# Altium PCB PCI Express Mini L1_V1.PCBDOC (part 9 of 9)
Units mm, origin at the board's own origin, x right, y up, seen from the top; angles counter-clockwise.
Board outline 70 x 83.2 mm, 6 copper layers (TopLayer, Layer 1, Layer 2, Layer 3, Layer 4, Bottom Layer), stack 0.914 mm thick; 442 components, 259 nets, 1412 pads, 857 vias.
Unrouted connection lines stored in the file: 2.
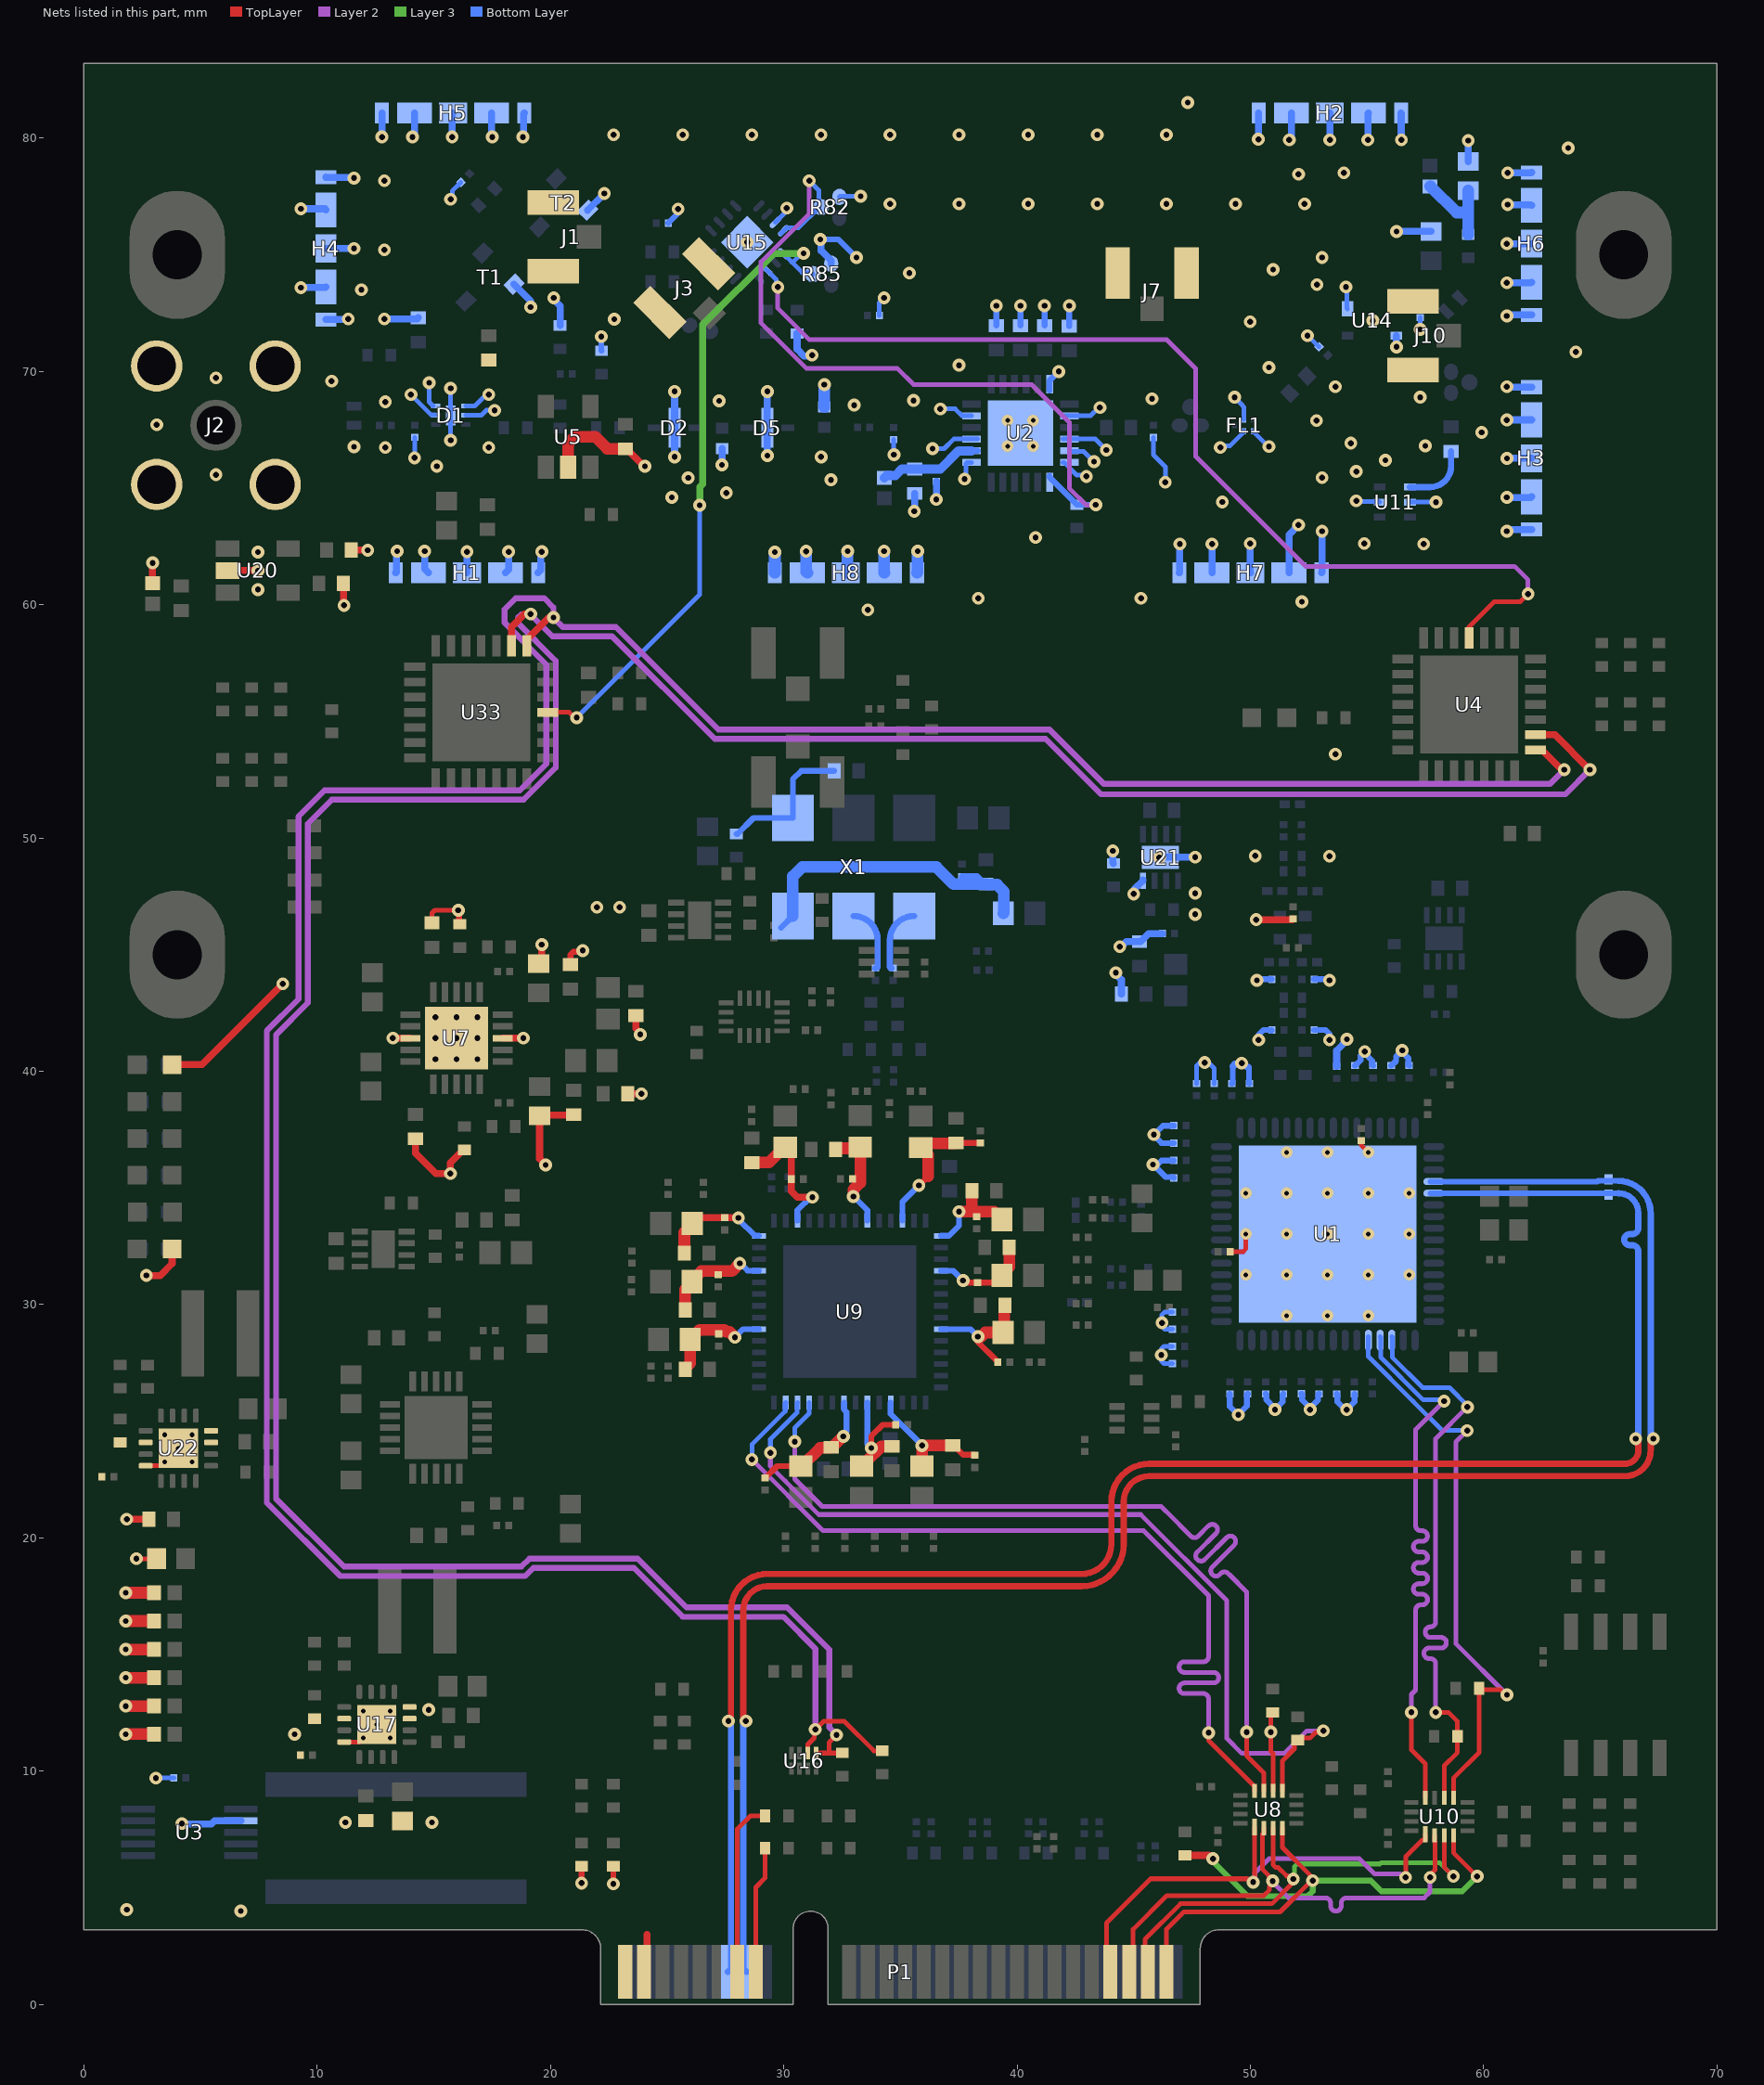
[diagram p9: the nets of this part, all layers, seen from the top]

## Via types
v1: diameter 0.55, hole 0.25, TopLayer to Bottom Layer, tented both sides, 782 vias
v2: diameter 0.55, hole 0.25, TopLayer to Bottom Layer, 40 vias
v3: diameter 0.5, hole 0.2, TopLayer to Bottom Layer, 25 vias
v4: diameter 0.35, hole 0.2, TopLayer to Bottom Layer, 10 vias

## Nets (pads, with @x,y where several pads share a name; then routed paths per layer and width w, separated by ;. In a path a pad name is that pad's centre, name@x,y a point inside that pad or via, vN(x,y) a via of type N, cw(c..) or ccw(c..) an arc to the next point about the centre after c; other vN are vias at no path point) (continued)
PGND: C27.1 C29.1 C44.1 C86.1 C87.1 C90.1 C93.1 D7.2 FB1.1 FB5.1 FB6.1 FB13.1 FB14.1 FB30.1 P1.1 P1.3 R121.1 R125.1 R129.2 R130.2 U3.7 U17.6 U17.8 U17.15 U17.16 U17.17 U22.6 U22.8 U22.15 U22.16 U22.17 | length 21.2
  TopLayer w0.2: v1(2.254,19.109) C87.1@3.115,19.109 ; U22.8@2.47,23.092 U22.8@2.65,23.092 2.66,23.102 3.31,23.102 v4(3.47,23.262) v4(4.05,23.842) ; U17.8@11.156,11.253 11.806,11.253 v4(11.976,11.423) v4(12.556,12.003)
  TopLayer w0.25: v1(21.333,5.206) R129.2@21.333,5.925 ; v2(22.691,5.168) R130.2@22.691,5.925
  TopLayer w0.3: v1(1.837,20.801) C90.1@2.79,20.8 ; v1(2.675,31.25) 3.274,31.25 3.781,31.756 D7.2@3.781,32.38 ; P1.3@24,1.4 24.142,1.542 24.142,2.999
  TopLayer w0.5: v1(1.79,11.589) FB1.1@3.009,11.588 ; v1(1.79,12.792) FB30.1@3.009,12.792 ; v1(1.79,14.006) FB13.1@3.009,14.006 ; v1(1.79,15.221) FB6.1@3.009,15.221 ; v1(1.79,16.436) FB14.1@3.009,16.435 ; v1(1.79,17.65) FB5.1@3.009,17.65
  Bottom Layer w0.2: v1(3.083,9.703) 3.085,9.706 3.85,9.706 C44.1@3.852,9.708
  Bottom Layer w0.3: v1(4.197,7.756) 4.213,7.739 5.466,7.739 5.602,7.875 U3.7@6.724,7.875
  other v1: 6.724,4.006 1.837,4.067 11.206,7.806 14.913,7.806 14.781,12.633
  other v2: 9.031,11.588
  other v4: 13.136,11.423 11.976,12.583 13.136,12.583 4.63,23.262 3.47,24.422 4.63,24.422
Q: R85.3 U15.13 U33.4 | length 28.3
  TopLayer w0.2: U33.4@19.88,55.391 20.797,55.391 21.026,55.162 v1(21.121,55.162)
  Layer 3 w0.3: v1(26.396,64.264) 26.396,65.049 26.526,65.179 26.526,72.006 29.58,75.06 v1(30.844,75.06)
  Bottom Layer w0.2: v1(21.121,55.162) 26.396,60.437 v1(26.396,64.264) ; U15.13@29.989,75.044 30.339,74.693 ; v1(30.844,75.06) 30.764,75.06 30.398,74.693 30.339,74.693 ; R85.3@31.243,74.171 31.177,74.237 30.796,74.237 30.339,74.693
Q\: R39.1 R82.3 U2.19 U15.12 | length 32
  Layer 2 w0.2: v1(31.091,78.175) 31.091,76.767 29.025,74.701 29.025,72.074 30.972,70.127 34.873,70.127 35.567,69.433 40.625,69.433 42.235,67.823 42.235,64.996 42.967,64.264 43.347,64.264 v1(43.37,64.287)
  Bottom Layer w0.2: U15.12@29.883,75.928 U15.12@29.943,75.988 ; U15.12@29.989,76.034 30.12,76.165 30.634,76.165 31.505,77.036 31.503,77.038 31.503,77.764 v1(31.091,78.175)
  Bottom Layer w0.25: U2.19@41.389,65.525 41.389,65.475 R39.1@42.541,64.323 ; R39.1@42.562,64.287 v1(43.37,64.287)
RFGND: C1.2 C2.2 C4.1 C7.1 C8.1 C9.1 C10.2 C11.2 C12.2 C13.2 C14.2 C24.1 C30.1 C31.1 C33.1 C34.1 C42.1 C46.1 C47.2 C51.2 C61.1 C63.1 C66.1 C67.1 C68.1 C69.1 C71.1 C72.1 C77.1 C78.1 C83.2 C84.1 C85.1 C99.1 C100.1 C101.1 C102.1 C103.1 C104.1 C105.1 C106.1 C107.1 C108.1 C109.1 C110.1 C111.1 C113.1 C114.1 C115.1 C116.1 C117.1 C118.1 C119.1 C120.1 C121.1 C122.1 C123.1 C124.1 C125.1 C252.1 C253.1 C256.1 C257.1 C259.1 D1.2 D1.3 D1.4 D1.5 D1.7 D2.2 D3.2 D5.2 FB11.2 FL1.B FL1.C FL1.E H1.1 H2.1 H3.1 H4.1 H5.1 H6.1 H7.1 H8.1 J1.1 J1.3 J2.MH J3.1 J3.3 J7.1 J7.3 J10.1 J10.3 L1.1 L4.1 R58.1 R60.1 R68.1 R82.1 R85.1 R87.1 R88.2 R103.2 T1.2 T2.2 U1.65 U2.1 U2.3 U2.5 U2.12 U2.14 U2.16 U2.17 U2.18 U2.25 U5.2 U7.3 U7.13 U7.21 U11.2 U11.5 U14.2 U14.4 U15.11 U15.17 U20.2 U21.4 U21.9 | length 170
  TopLayer w0.2: C47.2@14.916,46.368 14.916,46.788 15.034,46.905 v1(16.045,46.905) ; C121.1@49.128,32.275 49.691,32.275 49.808,32.392 v3(49.808,33.025) ; C69.1@54.753,37.027 54.753,36.83 v3(55.058,36.525)
  TopLayer w0.25: v1(16.045,46.905) 16.081,46.869 16.081,46.343 R58.1@16.116,46.307 ; C71.1@20.848,44.572 20.848,44.995 20.976,45.123 21.326,45.123 v1(21.383,45.18)
  TopLayer w0.3: FB11.2@2.944,60.919 v1(2.944,61.795) ; D3.2@3.781,40.283 5.058,40.283 v1(8.525,43.75) ; U20.2@6.158,61.462 v1(7.458,61.462) ; C63.1@11.122,60.919 11.136,60.905 11.136,59.989 v1(11.15,59.975) ; C61.1@11.459,62.346 11.463,62.343 12.158,62.343 v1(12.162,62.34) ; v1(13.242,41.423) U7.3@13.995,41.423 ; C51.2@14.205,37.107 14.205,36.494 15.083,35.617 v1(15.708,35.617) 15.708,36.082 16.264,36.637 R60.1@16.314,36.637 ; U7.13@17.945,41.423 v1(18.832,41.423) ; C42.1@19.49,44.614 19.627,44.75 v1(19.627,45.436) ; v1(19.791,35.989) 19.532,36.247 C46.1@19.532,38.093 19.557,38.117 20.974,38.117 C67.1@20.998,38.142 ; C34.1@23.212,66.683 23.262,66.683 24.013,65.932 v1(24.048,65.932) ; C68.1@23.304,39.041 v1(23.896,39.041) ; C72.1@23.659,42.386 23.659,41.836 23.846,41.648 v1(23.846,41.58) ; v1(50.25,46.5) 51.785,46.5 ccw(c51.785,46.54) C4.1@51.822,46.526
  TopLayer w0.5: U5.2@20.755,65.901 20.755,66.908 21.048,67.201 21.918,67.201 22.436,66.683 C34.1@23.212,66.683
  Bottom Layer w0.2: v1(14.016,69.006) 14.872,68.15 D1.2@15.039,68.15 ; v1(14.175,66.298) C252.1@14.175,67.175 ; v1(14.795,69.519) 14.795,68.695 D1.3@14.97,68.52 ; v1(15.72,67.05) D1.7@15.72,68.12 v1(15.72,69.273) ; v1(15.72,77.382) 15.787,77.448 15.787,77.733 C84.1@16.16,78.107 ; D1.5@16.37,68.12 17.033,68.12 17.247,68.334 v1(17.604,68.334) ; D1.4@16.37,68.52 16.756,68.52 17.242,69.006 v1(17.355,69.006) ; U15.11@29.635,76.387 30.125,76.877 v1(30.125,77) ; R82.1@32.386,77.486 32.408,77.508 v1(33.295,77.508) ; C83.2@34.098,72.402 34.098,72.955 v1(34.294,73.152) ; C253.1@34.699,67.08 34.699,66.453 v1(34.72,66.433) ; v1(36.378,66.691) 36.875,66.691 37.284,67.1 U2.3@38.039,67.1 U2.3@38.314,67.1 ; v1(36.708,68.395) 37.34,68.395 37.635,68.1 U2.5@38.039,68.1 ; v1(37.747,65.385) 37.805,65.443 37.805,66.05 37.855,66.1 U2.1@38.039,66.1 ; U2.18@41.964,66.1 42.014,66.1 42.557,65.557 42.907,65.557 42.961,65.503 v1(42.967,65.503) ; U2.16@41.964,67.1 U2.16@42.239,67.1 ; U2.14@41.964,68.1 43.153,68.1 43.503,68.45 v1(43.55,68.45) ; U2.17@42.251,66.575 42.851,66.575 v1(43.295,66.131) ; U2.16@42.452,67.1 U2.16@42.239,67.1 ; v1(43.825,66.634) 43.359,67.1 U2.16@42.239,67.1 ; C256.1@45.841,67.168 45.841,66.427 46.35,65.918 v1(46.35,65.25) ; v1(46.208,29.219) 46.208,29.57 46.325,29.687 C118.1@46.658,29.687 ; 46.325,28.948 C99.1@46.658,28.948 ; C117.1@46.658,27.471 46.296,27.471 46.177,27.591 v1(46.177,27.842) 46.177,28.093 46.294,28.21 C101.1@46.658,28.21 ; C114.1@47.698,39.472 47.698,40.242 47.807,40.35 48.228,40.35 48.454,40.124 C115.1@48.454,39.468 ; v1(48.712,66.739) 48.779,66.805 49.117,66.805 49.725,67.413 FL1.B@49.725,67.438 ; v1(49.325,68.892) 49.325,68.879 49.666,68.538 cw(c49.525,68.396) 49.725,68.395 49.724,67.974 ccw(c50.208,67.973) 49.724,67.954 FL1.E@49.725,67.938 ; FL1.C@50.125,67.438 50.125,67.413 50.759,66.778 v1(50.797,66.778) ; v1@50.95,74.344 v1(50.973,74.367) ; v1(52.443,71.532) 52.458,71.532 52.931,71.059 C257.1@52.946,71.059 ; v1(54.093,73.624) 54.126,73.591 54.126,72.716 U14.2@54.159,72.682 ; v1(54.538,64.455) 54.565,64.427 55.513,64.427 U11.5@55.54,64.4 ; U11.2@56.84,64.4 v1(57.956,64.4) ; v1@57.275,71.804 C259.1@57.275,72.312
  Bottom Layer w0.25: v1(22.176,71.493) 22.181,71.488 22.181,70.892 R88.2@22.185,70.887 ; C85.1@25.048,76.363 25.469,76.784 v1(25.469,76.964) ; v1@31.598,75.619 31.637,75.657 32.342,75.657 v1(33.111,74.888) ; C14.2@39.11,71.968 v1(39.11,72.815) ; C13.2@40.145,71.968 40.146,71.969 40.146,72.814 v1(40.147,72.815) ; C12.2@41.175,71.968 v1(41.175,72.816) ; U2.12@41.389,69.175 41.389,69.597 v1(41.789,69.997) ; C11.2@42.237,71.944 v1(42.237,72.816) ; v1(45.821,36.003) v1@45.919,35.905 ; C116.1@46.717,35.432 46.717,35.442 46.692,35.467 46.368,35.467 45.93,35.905 v1@45.919,35.905 ; C102.1@46.717,36.178 46.192,36.178 v1@45.919,35.905 ; C100.1@46.717,36.924 46.192,36.924 45.863,37.252 v1(45.863,37.287) 46.245,37.669 C113.1@46.717,37.669 ; C120.1@49.116,26.172 49.116,25.857 49.116,25.638 v1(49.477,25.276) 49.553,25.352 49.852,25.651 49.852,25.857 49.852,26.147 49.877,26.172 C119.1@49.887,26.172 ; C103.1@49.204,39.473 49.214,39.473 49.239,39.498 49.239,40.204 49.249,40.213 ; v1@49.829,40.213 49.843,40.2 49.915,40.2 49.94,40.174 49.94,39.48 C125.1@49.95,39.48 ; v1(50.275,43.901) cw(c50.323,43.901) 50.323,43.949 C1.2@50.916,43.949 ; v1(50.35,41.343) 50.35,41.556 50.569,41.775 C2.2@50.916,41.775 cw(c50.878,41.775) C2.2@50.878,41.736 ; C111.1@50.652,26.176 50.662,26.176 50.687,26.151 50.687,25.924 51.05,25.56 v1(51.05,25.5) 51.379,25.828 51.379,26.144 51.404,26.169 C123.1@51.414,26.169 ; C122.1@52.183,26.181 52.193,26.181 52.218,26.156 52.218,25.908 v1@52.558,25.567 ; v1(52.558,25.5) v1@52.558,25.567 ; C8.1@52.726,41.775 53.212,41.775 53.391,41.596 v1(53.391,41.343) ; C7.1@52.726,43.949 53.343,43.949 cw(c53.343,43.901) v1(53.391,43.901) ; C108.1@52.938,26.176 52.928,26.176 52.903,26.151 52.903,25.912 v1@52.558,25.567 ; C109.1@53.697,26.172 53.7,26.172 53.725,26.147 53.725,25.832 54.057,25.5 v1(54.125,25.5) 54.13,25.5 54.459,25.829 C110.1@54.459,26.169 ; C104.1@54.483,40.243 54.493,40.243 54.72,40.47 54.72,40.666 v1(54.901,40.846) 54.901,40.779 55.223,40.456 55.223,40.268 55.248,40.243 C105.1@55.258,40.243 ; C106.1@56.033,40.243 56.043,40.243 56.241,40.441 56.241,40.63 v1(56.507,40.896) 56.507,40.828 56.773,40.561 56.773,40.268 56.798,40.243 C107.1@56.808,40.243
  Bottom Layer w0.3: v1(9.298,73.594) 10.344,73.594 H4.1@10.375,73.625 ; v1(9.298,76.974) 10.326,76.974 H4.1@10.375,76.925 ; H4.1@10.375,72.225 10.388,72.237 11.312,72.237 v1(11.325,72.25) ; H4.1@10.375,75.275 v1(11.575,75.275) ; H4.1@10.375,78.325 10.392,78.308 11.558,78.308 v1(11.575,78.291) ; v1(12.775,80.05) H5.1@12.775,81.075 ; v1(12.879,72.252) 14.281,72.252 C30.1@14.335,72.306 ; H1.1@13.366,61.365 13.396,61.394 13.396,62.271 v1(13.425,62.3) ; v1(14.079,80.05) 14.175,80.146 H5.1@14.175,81.075 ; v1(14.604,62.3) 14.604,61.527 H1.1@14.766,61.365 ; v1@15.72,66.967 v1(15.72,67.05) ; v1(15.785,80.05) 15.785,81.035 H5.1@15.825,81.075 ; H1.1@16.416,61.365 v1(16.416,62.271) ; H5.1@17.475,81.075 17.475,80.077 v1(17.502,80.05) ; H1.1@18.066,61.365 18.204,61.502 v1(18.204,62.271) ; T1.2@18.436,73.736 19.148,73.024 v1(19.148,72.757) ; v1(18.816,80.05) 18.846,80.079 18.846,81.046 H5.1@18.875,81.075 ; H1.1@19.466,61.365 19.587,61.485 19.587,62.232 v1(19.625,62.271) ; v1(20.135,73.152) 20.135,73.084 20.41,72.809 R87.1@20.41,71.97 ; T2.2@21.592,76.913 v1(22.305,77.627) ; v1(25.319,66.34) D2.2@25.319,67.582 v1(25.319,69.142) ; v1(27.349,65.992) L1.1@27.349,66.691 ; v1(29.295,66.39) D5.2@29.295,67.582 v1(29.295,69.142) ; R103.2@30.569,71.627 30.569,70.952 30.857,70.663 31.158,70.663 31.165,70.657 v1(31.21,70.702) ; v1@31.598,75.619 31.598,75.184 32.03,74.752 R85.1@32.03,74.621 ; v1(35.587,64.008) 35.601,64.022 35.601,64.758 C10.2@35.616,64.772 ; v1(36.538,64.512) C9.1@36.538,65.297 ; v1(44.1,49.45) 44.1,48.937 R68.1@44.127,48.91 ; v1(44.227,44.232) 44.227,44.164 44.469,43.922 C78.1@44.469,43.31 ; v1(44.402,45.342) 44.47,45.342 44.688,45.56 C77.1@45.244,45.56 45.294,45.56 45.638,45.903 C66.1@46.222,45.903 ; v1(44.994,47.606) 45.042,47.654 45.042,47.824 45.394,48.176 U21.4@45.394,48.214 ; U21.9@46.144,49.164 46.159,49.179 v1(47.633,49.179) ; H7.1@46.95,61.365 46.961,61.376 46.961,62.594 v1(46.973,62.606) ; H7.1@48.35,61.365 48.354,61.369 v1(48.354,62.606) ; 49.249,40.213 49.338,40.302 49.577,40.302 v1(49.625,40.35) 49.693,40.35 v1@49.829,40.213 ; v1(49.986,62.623) 49.986,61.379 H7.1@50,61.365 ; v1(50.341,79.95) 50.348,79.956 50.348,81.068 H2.1@50.355,81.075 ; H7.1@51.65,61.365 51.65,63.008 v1(52.062,63.419) ; v1(51.663,79.927) 51.663,79.981 51.755,80.072 H2.1@51.755,81.075 ; H7.1@53.05,61.365 53.073,61.388 v1(53.073,63.152) ; v1(53.405,79.927) H2.1@53.405,81.075 ; C124.1@53.697,40.218 53.697,40.891 54.131,41.325 v1(54.131,41.379) ; v1(55.035,79.927) 55.035,81.056 H2.1@55.055,81.075 ; v1(56.259,71.052) U14.4@56.259,71.532 ; v1(56.259,76) C31.1@57.751,76 ; H2.1@56.455,81.075 56.462,81.067 56.462,79.934 v1(56.47,79.927) ; C33.1@59.334,79 v1(59.334,79.9) ; v1(60.99,63.152) 61.044,63.152 61.117,63.225 H3.1@62.05,63.225 ; v1(60.99,64.602) 62.027,64.602 H3.1@62.05,64.625 ; v1(60.99,67.919) 60.996,67.925 H3.1@62.05,67.925 ; v1(60.99,69.343) 61.008,69.325 H3.1@62.05,69.325 ; v1(60.99,72.375) 61.04,72.425 H6.1@62.05,72.425 ; v1(60.99,73.8) 62.025,73.8 H6.1@62.05,73.825 ; v1(60.99,75.475) H6.1@62.05,75.475 ; v1(60.996,66.275) H3.1@62.05,66.275 ; v1(61.025,78.517) 61.029,78.521 62.046,78.521 H6.1@62.05,78.525 ; v1(61.029,77.15) 62.025,77.15 H6.1@62.05,77.125
  Bottom Layer w0.5: H8.1@29.609,61.365 29.613,61.369 29.613,62.251 v1(29.618,62.255) ; v1(30.956,62.29) 30.956,61.417 H8.1@31.009,61.365 ; L4.1@31.736,68.482 v1(31.736,69.433) ; H8.1@32.659,61.365 32.733,61.439 v1(32.733,62.3) ; v1(34.294,62.3) 34.294,61.379 H8.1@34.309,61.365 ; H8.1@35.709,61.365 35.731,61.387 35.731,62.29 v1(35.741,62.3)
  other v1: 48.041,40.374 15.07,40.523 15.97,40.523 16.87,40.523 15.07,41.423 15.97,41.423 16.87,41.423 15.07,42.323 15.97,42.323 16.87,42.323 47.633,46.729 21.989,47.031 22.964,47.031 47.633,47.635 46.095,49.164 50.208,49.235 53.391,49.223 53.643,53.598 33.601,59.779 52.208,60.129 38.336,60.279 45.31,60.275 7.458,60.65 7.458,62.255 54.883,62.623 57.425,62.606 40.794,62.881 48.793,64.405 25.197,64.602 27.538,64.796 32.024,65.354 25.901,65.438 53.073,65.447 5.658,65.572 54.538,65.711 15.124,65.937 55.79,66.197 31.596,66.34 12.916,66.74 17.355,66.74 11.575,66.774 57.497,66.809 54.305,66.925 59.91,67.386 3.118,67.718 52.834,67.898 33.015,68.555 12.916,68.695 27.23,68.742 35.556,68.755 45.785,68.831 57.275,68.892 53.643,69.343 10.618,69.588 5.658,69.722 50.797,70.169 37.508,70.265 63.95,70.84 57.275,71.804 49.986,72.128 55.25,72.175 22.735,72.237 11.898,73.5 52.851,73.721 35.383,74.217 53.073,74.888 12.879,75.213 28.433,75.539 31.56,75.657 34.551,77.184 37.513,77.184 40.474,77.184 43.436,77.184 46.397,77.184 49.359,77.184 52.32,77.184 12.879,78.175 52.062,78.451 54.005,78.517 63.625,79.575 22.705,80.146 25.667,80.146 28.628,80.146 31.59,80.146 34.551,80.146 37.513,80.146 40.474,80.146 43.436,80.146 46.397,80.146 47.311,81.525
  other v3: 51.558,29.525 53.308,29.525 55.058,29.525 49.808,31.275 51.558,31.275 53.308,31.275 55.058,31.275 56.808,31.275 51.558,33.025 53.308,33.025 55.058,33.025 56.808,33.025 49.808,34.775 51.558,34.775 53.308,34.775 55.058,34.775 56.808,34.775 51.558,36.525 53.308,36.525 39.589,66.8 40.689,66.8 39.589,67.9 40.689,67.9
RST: U4.18 U15.15 | length 45.1
  TopLayer w0.2: U4.18@59.375,58.575 59.375,59.054 60.449,60.129 61.568,60.129 v1(61.9,60.46)
  Layer 2 w0.2: v1(29.741,73.618) 29.741,72.709 31.091,71.359 46.418,71.359 47.65,70.127 47.65,66.362 52.364,61.647 61.322,61.647 61.9,61.069 v1(61.9,60.46)
  Bottom Layer w0.2: U15.15@29.176,74.425 U15.15@29.176,74.443 ; U15.15@29.282,74.337 29.674,73.944 29.674,73.779 29.715,73.739 v1@29.741,73.739
SCK: R44.1 U4.8 U16.6 U33.8 | length 136.2
  TopLayer w0.2: U16.6@31.026,10.779 31.026,11.148 31.305,11.427 31.305,11.73 v2@31.375,11.8 ; v2(31.35,11.795) 31.368,11.795 31.705,12.132 32.601,12.132 33.858,10.874 R44.1@34.221,10.874
  TopLayer w0.3: U33.8@18.98,58.241 18.98,58.506 19.924,59.45 v1(20.125,59.45) ; U4.8@62.225,53.775 62.49,53.775 63.289,52.976 63.402,52.976 v1(63.45,52.928)
  Layer 2 w0.25: v2(31.35,11.795) 31.35,15.245 29.976,16.62 25.667,16.62 23.575,18.712 19.262,18.712 18.919,18.369 10.98,18.369 7.835,21.514 7.835,41.732 9.2,43.097 9.2,50.925 10.318,52.043 18.686,52.043 19.824,53.181 19.824,57.434 18.026,59.232 18.026,59.797 18.508,60.279 19.733,60.279 20.125,59.887 v1(20.125,59.45) 20.525,59.05 22.799,59.05 27.201,54.648 41.387,54.648 43.712,52.323 62.845,52.323 v1(63.45,52.928)
SDA: R43.1 U4.9 U16.5 U33.9 | length 135.2
  TopLayer w0.2: U16.5@31.376,10.779 31.937,10.779 ; v2(32.261,11.557) 31.937,11.233 31.937,10.779 ; R43.1@32.509,10.79 32.499,10.779 31.937,10.779
  TopLayer w0.3: U33.9@18.33,58.241 18.336,58.247 18.336,59.051 18.885,59.601 v1(19.148,59.601) ; U4.9@62.225,54.425 63.054,54.425 v1(64.55,52.928)
  Layer 2 w0.25: v2(32.261,11.557) 31.95,11.868 31.95,15.21 30.141,17.02 25.833,17.02 23.741,19.112 19.096,19.112 18.753,18.769 11.146,18.769 8.235,21.68 8.235,41.566 9.6,42.931 9.6,50.617 10.626,51.643 18.851,51.643 20.224,53.015 20.224,57.6 18.598,59.225 18.598,59.432 18.745,59.579 19.148,59.579 20.077,58.65 22.634,58.65 27.036,54.248 41.221,54.248 43.597,51.873 63.495,51.873 v1(64.55,52.928)
SMCLK: P1.15 R51.1 | length 5.5
  TopLayer w0.2: P1.15@28.8,1.4 28.8,5.025 29.2,5.425 R51.1@29.2,6.705
SMDAT: P1.13 R50.1 | length 7.6
  TopLayer w0.2: P1.13@28,1.4 28,7.519 28.569,8.088 R50.1@29.2,8.088
SPI__LMK_MOSI: U8.11 U9.11 | length 39.5
  TopLayer w0.2: v2(49.842,11.678) 49.842,10.665 50.57,9.937 U8.11@50.57,9.158
  Layer 2 w0.2: v1(30.472,24.127) 30.472,22.523 31.643,21.351 46.173,21.351 46.379,21.146 46.449,21.075 47.444,20.08 ccw(c47.605,20.241) 47.765,20.08 48.203,20.518 cw(c48.363,20.357) 48.524,20.518 cw(c48.363,20.357) 48.524,20.197 47.722,19.395 ccw(c47.882,19.234) 47.722,19.074 ccw(c47.882,19.234) 48.043,19.074 48.984,20.014 cw(c49.144,19.854) 49.305,20.014 cw(c49.144,19.854) 49.305,19.693 48.364,18.753 ccw(c48.525,18.592) 48.364,18.432 ccw(c48.525,18.592) 48.685,18.432 48.728,18.475 cw(c48.889,18.314) 49.049,18.475 49.12,18.404 49.842,17.682 v2(49.842,11.678)
  Bottom Layer w0.2: v1(30.472,24.127) 30.472,24.714 31.081,25.324 U9.11@31.081,25.8
SPI_CLK_AD: U1.36 U10.12 | length 25.3
  TopLayer w0.2: v2(56.9,12.525) 56.9,10.918 57.503,10.315 U10.12@57.503,8.853
  Layer 2 w0.2: v2(56.9,12.525) 56.9,13.291 57.082,13.473 57.082,16.349 57.082,16.903 cw(c57.309,16.903) 57.309,17.13 57.366,17.13 ccw(c57.366,17.357) 57.366,17.584 57.214,17.584 cw(c57.214,17.811) 57.214,18.038 57.366,18.038 ccw(c57.366,18.265) 57.366,18.492 57.214,18.492 cw(c57.214,18.719) 57.214,18.946 57.366,18.946 ccw(c57.366,19.173) 57.366,19.4 57.214,19.4 cw(c57.214,19.627) 57.214,19.854 57.361,19.854 ccw(c57.361,20.081) 57.361,20.308 57.309,20.308 cw(c57.309,20.535) 57.082,20.535 57.082,21.35 57.082,24.64 v1(58.303,25.861)
  Bottom Layer w0.2: U1.36@55.558,28.625 55.578,28.605 55.578,27.749 57.407,25.919 58.245,25.919 v1(58.303,25.861)
SPI_CLK_MB: P1.45 U8.1 U10.1 | length 21.4
  TopLayer w0.2: P1.45@44,1.4 43.834,1.566 43.834,3.006 43.825,3.016 43.825,3.492 45.723,5.39 49.881,5.39 50.025,5.245 v1(50.12,5.245) 50.17,5.295 U8.1@50.17,7.608 ; v2(56.653,5.45) 56.663,5.46 56.663,6.348 57.368,7.053 57.503,7.053 U10.1@57.503,7.303
  Layer 2 w0.2: v1(50.12,5.245) 50.187,5.312 50.187,5.639 50.797,6.249 54.669,6.249 55.323,5.595 56.413,5.595 56.558,5.45 v2(56.653,5.45)
SPI_CS_AD: R36.2 U1.37 U10.9 | length 25.3
  TopLayer w0.2: U10.9@58.703,8.853 58.703,9.701 59.804,10.802 59.804,13.551 59.804,13.5 60.708,13.5 60.932,13.275 v2(61,13.275)
  Layer 2 w0.2: v1(59.29,24.603) 58.803,24.116 58.803,15.472 v2(61,13.275)
  Bottom Layer w0.2: U1.37@55.058,28.625 55.058,27.773 56.975,25.857 58.228,24.603 v1(59.29,24.603)
SPI_LMK_CLK: U8.12 U9.13 | length 39.4
  TopLayer w0.2: v2(48.208,11.649) 48.208,11.32 50.17,9.358 U8.12@50.17,9.158
  Layer 2 w0.2: v1(28.631,23.362) 31.686,20.308 45.427,20.308 48.208,17.527 48.208,15.472 48.208,14.918 cw(c47.981,14.918) 47.981,14.691 47.167,14.691 ccw(c47.167,14.464) 47.167,14.237 48.413,14.237 cw(c48.413,14.01) 48.413,13.783 47.167,13.783 ccw(c47.167,13.556) 47.167,13.329 47.981,13.329 cw(c47.981,13.102) 48.208,13.102 48.208,12.182 v2(48.208,11.649)
  Bottom Layer w0.2: v1(28.631,23.362) 28.631,23.53 28.631,24.005 30.061,25.435 30.061,25.78 U9.13@30.081,25.8
SPI_LMK_CS: R73.1 U8.9 U9.12 | length 39.6
  TopLayer w0.2: U8.9@51.37,9.158 51.37,10.446 51.891,10.967 51.891,11.207 52.103,11.419 52.552,11.419 52.796,11.663 53.058,11.663 v2(53.125,11.73)
  Layer 2 w0.2: v1(29.425,23.65) 29.425,23.53 29.425,23.075 30.062,22.437 31.498,21.001 45.3,21.001 48.99,17.311 48.99,11.406 49.633,10.763 51.452,10.763 52.42,11.73 v2(53.125,11.73)
  Bottom Layer w0.2: v1(29.425,23.65) 29.425,24.233 30.561,25.37 30.561,25.78 U9.12@30.581,25.8
SPI_LMK_MISO: R75.2 U8.10 | length 3.4
  TopLayer w0.2: R75.2@50.955,12.519 50.87,12.434 v2(50.87,11.678) 50.87,10.863 50.97,10.763 U8.10@50.97,9.158
SPI_MISO_MB: P1.49 U8.3 U10.3 | length 21.2
  TopLayer w0.2: P1.49@45.6,1.4 45.483,1.517 45.483,2.802 47.001,4.32 50.92,4.32 51.768,5.168 51.768,5.309 v1(51.835,5.376) 51.741,5.376 51.608,5.509 51.555,5.509 51.194,5.87 51.087,5.87 50.97,5.987 U8.3@50.97,7.558 ; U10.3@58.303,7.253 58.303,5.887 v2(58.697,5.493)
  Layer 3 w0.2: v1(51.835,5.376) 51.881,5.422 51.881,5.908 51.999,6.025 55.541,6.025 55.599,6.083 58.106,6.083 v2(58.697,5.493)
SPI_MOSI_AD: R29.1 U1.35 U10.10 | length 25.4
  TopLayer w0.2: v2(57.943,12.525) 58.484,12.525 58.875,12.134 R29.1@58.875,11.492 58.875,10.802 58.303,10.23 U10.10@58.303,8.853
  Layer 2 w0.2: v2(57.943,12.525) 57.943,14.499 57.943,14.599 ccw(c57.716,14.599) 57.716,14.826 57.659,14.826 cw(c57.659,15.053) 57.659,15.28 58.173,15.28 ccw(c58.173,15.507) 58.173,15.734 57.716,15.734 cw(c57.716,15.961) 57.716,16.188 ccw(c57.716,16.415) 57.943,16.415 57.943,19.577 57.943,24.253 v1(59.3,25.611)
  Bottom Layer w0.2: U1.35@56.058,28.625 56.078,28.605 56.078,27.744 57.374,26.447 58.53,26.447 59.3,25.677 v1(59.3,25.611)
SPI_MOSI_MB: P1.47 U8.2 U10.2 | length 21.8
  TopLayer w0.2: P1.47@44.8,1.4 44.975,1.575 44.975,3.016 44.975,3.222 46.423,4.67 50.573,4.67 50.818,4.915 50.818,5.063 50.955,5.201 v1(50.955,5.295) ; U8.2@50.57,7.558 50.57,7.358 50.52,7.308 50.52,5.788 50.955,5.353 v1@50.955,5.267 ; v2(57.703,5.45) 57.77,5.517 57.77,5.628 57.914,5.773 57.914,6.983 57.903,6.994 U10.2@57.903,7.253
  Layer 2 w0.2: v1(50.955,5.295) 50.955,5.251 51.637,4.569 52.449,4.569 53.211,4.569 cw(c53.211,4.342) 53.438,4.342 53.438,4.227 ccw(c53.665,4.227) 53.892,4.227 53.892,4.342 cw(c54.119,4.342) 54.119,4.569 54.219,4.569 57.448,4.569 57.703,4.824 v2(57.703,5.45)
SPI_nCS_1_MB: P1.51 R48.1 U8.4 U10.4 | length 28.2
  TopLayer w0.2: P1.51@46.4,1.4 46.4,3.224 47.146,3.97 51.273,3.97 v1@52.615,5.312 ; U8.4@51.37,7.558 51.37,6.73 52.536,5.565 52.536,5.367 52.59,5.312 v1@52.615,5.312 ; v1(52.67,5.312) v1@52.615,5.312 ; U10.4@58.703,7.253 58.703,6.507 v2(59.717,5.493)
  TopLayer w0.3: R48.1@47.201,6.393 48.208,6.393 48.353,6.249 v1(48.393,6.249)
  Layer 3 w0.25: v1(48.393,6.249) 48.393,6.123 49.667,4.85 49.872,4.645 52.465,4.645 52.67,4.85 v1(52.67,5.312) 55.158,5.312 55.62,4.85 59.075,4.85 v2(59.717,5.493)
SYNC_N: P1.12 R99.1 U1.21 | length 79.8
  TopLayer w0.268: v1(27.625,12.153) ccw(c27.625,12.264) 27.736,12.264 27.736,16.903 cw(c29.288,16.903) 29.288,18.455 42.762,18.455 ccw(c42.762,19.732) 44.039,19.732 44.039,21.558 cw(c45.656,21.558) 45.656,23.175 63.482,23.175 65.485,23.175 66.051,23.175 ccw(c66.051,23.752) 66.629,23.752 66.629,24.139 ccw(c66.518,24.139) v1(66.518,24.25)
  Bottom Layer w0.24: U1.21@57.708,34.775 65.775,34.775
  Bottom Layer w0.268: P1.12@27.6,1.4 27.736,1.536 27.736,5.261 27.736,12.042 ccw(c27.625,12.042) v1(27.625,12.153) ; 65.775,34.775 cw(c65.775,33.921) 66.629,33.921 66.629,33.289 cw(c66.361,33.289) 66.361,33.021 66.256,33.021 ccw(c66.256,32.785) 66.256,32.549 66.361,32.549 cw(c66.361,32.281) 66.629,32.281 66.629,32.147 66.629,24.361 cw(c66.518,24.361) v1(66.518,24.25)
SYNC_P: P1.14 R99.2 U1.20 | length 79.8
  TopLayer w0.268: v1(28.375,12.153) cw(c28.375,12.264) 28.264,12.264 28.264,16.903 cw(c29.288,16.903) 29.288,17.927 42.762,17.927 ccw(c42.762,19.732) 44.567,19.732 44.567,21.558 cw(c45.656,21.558) 45.656,22.647 66.051,22.647 ccw(c66.051,23.752) 67.157,23.752 67.157,24.139 cw(c67.268,24.139) v1(67.268,24.25)
  Bottom Layer w0.24: U1.20@57.708,35.275 64.871,35.275 cw(c64.899,35.275) 64.899,35.303 65.775,35.303
  Bottom Layer w0.268: v1(28.375,12.153) ccw(c28.375,12.042) 28.264,12.042 28.264,5.261 28.264,1.536 P1.14@28.4,1.4 ; 65.775,35.303 cw(c65.775,33.921) 67.157,33.921 67.157,24.361 ccw(c67.268,24.361) v1(67.268,24.25)
Tor_RF_50: C32.2 U11.1 | length 2.9
  Bottom Layer w0.268: U11.1@56.84,65.05 56.84,65.043 57.702,65.043 ccw(c57.702,65.941) 58.6,65.941 C32.2@58.6,66.573
VC_CTRL: C177.2 R89.2 X1.1 | length 6.3
  Bottom Layer w0.25: R89.2@27.969,50.179 28.019,50.179 28.701,50.86 X1.1@30.386,50.86 30.386,52.516 30.751,52.881 C177.2@32.157,52.881
VC_SUPP: C209.2 C210.2 FB26.2 X1.6 | length 14.1
  Bottom Layer w0.268: X1.6@29.884,46.158 X1.6@30.386,46.66 ; C209.2@37.639,48.354 38.284,48.354 C210.2@38.614,48.024
  Bottom Layer w0.5: X1.6@30.386,46.66 30.386,48.354 30.792,48.76 36.538,48.76 37.274,48.024 38.614,48.024 C210.2@38.664,48.024 38.689,47.999 39.142,47.999 39.435,47.707 39.435,46.795 FB26.2@39.412,46.773
VCC_5_ATT: C9.2 C10.1 FB2.2 U2.2 | length 4.6
  Bottom Layer w0.25: U2.2@37.898,66.6 U2.2@38.314,66.6
  Bottom Layer w0.4: FB2.2@34.309,65.44 34.409,65.54 34.782,65.54 35.064,65.822 C10.1@35.616,65.822 35.621,65.817 C9.2@36.538,65.817 36.711,65.817 37.494,66.6 U2.2@38.039,66.6
VCC_AMP_5: C33.2 FB3.2 R46.2 | length 4
  Bottom Layer w0.5: FB3.2@57.702,77.935 57.722,77.935 58.845,76.812 59.334,76.812 ; R46.2@59.334,75.875 59.334,76.812 ; C33.2@59.334,77.75 59.334,76.812
VCXO_OUT_N: C178.1 X1.5 | length 2.9
  Bottom Layer w0.268: X1.5@32.986,46.66 cw(c32.986,45.624) 34.022,45.624 34.022,44.514 cw(c33.928,44.514) C178.1@33.928,44.421
VCXO_OUT_P: C175.1 X1.4 | length 2.9
  Bottom Layer w0.268: C175.1@34.612,44.421 cw(c34.612,44.483) 34.55,44.483 34.55,45.624 cw(c35.586,45.624) X1.4@35.586,46.66
VDD_CORE: C152.2 C153.2 FB15.2 U9.8 | length 5.7
  TopLayer w0.25: C152.2@29.195,22.571 29.205,22.571 29.713,23.079 FB15.2@30.726,23.079
  TopLayer w0.255: v1@32.438,24.351 32.424,24.337 32.439,24.322 v1@32.439,24.315
  TopLayer w0.5: FB15.2@30.726,23.079 30.776,23.079 31.559,23.862 31.999,23.862 C153.2@32.024,23.887 32.074,23.887 32.538,24.351 v1(32.552,24.351)
  Bottom Layer w0.255: v1(32.552,24.351) 32.552,24.431 32.679,24.558 32.679,25.402 32.581,25.5 U9.8@32.581,25.8
VDD_IO: C160.2 C161.2 FB17.2 U9.31 | length 6.1
  TopLayer w0.3: FB17.2@30.111,36.74 30.322,36.529 C160.2@30.322,35.379 30.322,34.857 30.574,34.604 v1(31.226,34.604)
  TopLayer w0.5: C161.2@28.624,36.088 29.359,36.088 30.011,36.74 FB17.2@30.061,36.74 FB17.2@30.111,36.74
  Bottom Layer w0.25: U9.31@30.581,33.6 30.581,34.042 31.144,34.604 v1(31.226,34.604)
VDD_OSC: C217.2 C218.2 FB28.2 U9.37 | length 4.6
  TopLayer w0.5: C218.2@32.224,36.658 32.224,36.678 32.249,36.703 33.234,36.703 FB28.2@33.279,36.748 33.279,35.222 32.981,34.924 v1(32.981,34.637)
  Bottom Layer w0.25: v1(32.981,34.637) 33.576,34.041 33.576,33.605 U9.37@33.581,33.6
VDD_PLL1: C156.2 C157.2 FB16.2 U9.40 | length 6.4
  TopLayer w0.25: v1(35.791,35.111) 36.182,35.501 ; C157.2@37.375,36.933 C156.2@38.427,36.933
  TopLayer w0.5: 36.182,35.501 36.182,36.423 36.116,36.488 36.116,36.538 35.916,36.738 FB16.2@35.866,36.738 36.036,36.908 37.35,36.908 C157.2@37.375,36.933
  Bottom Layer w0.25: U9.40@35.081,33.6 35.081,34.401 v1(35.791,35.111)
VDD_PLL2CORE: C174.2 C180.2 FB19.2 U9.6 | length 5.4
  TopLayer w0.25: 33.777,23.561 33.752,23.586 v1(33.752,23.851) 33.752,24.37 33.777,24.395 34.232,24.851 C174.2@34.786,24.851
  TopLayer w0.5: FB19.2@33.586,23.329 34.181,23.924 C180.2@34.629,23.924
  Bottom Layer w0.25: U9.6@33.581,25.8 33.581,24.021 v1(33.752,23.851)
VDD_PLL2OSC: C197.2 C198.2 FB23.2 U9.4 | length 5.7
  TopLayer w0.25: C198.2@37.237,23.964 37.287,23.964 37.687,23.564 38.169,23.564 C197.2@38.194,23.539
  TopLayer w0.5: FB23.2@35.925,23.079 v1(35.925,23.959) 37.232,23.959 C198.2@37.237,23.964
  Bottom Layer w0.25: U9.4@34.581,25.8 34.581,25.316 35.925,23.973 v1(35.925,23.959)
VDDO_1/2: C184.2 C190.2 FB20.2 U9.20 | length 4.8
  TopLayer w0.5: C190.2@25.773,27.22 25.773,27.27 25.981,27.479 FB20.2@25.981,28.514 25.981,28.564 26.181,28.764 26.231,28.764 26.381,28.914 27.447,28.914 27.524,28.837 27.666,28.837 v1(27.906,28.597)
  Bottom Layer w0.25: v1(27.906,28.597) 28.259,28.95 U9.20@28.931,28.95
VDDO_3/4: C201.2 C202.2 FB24.2 U9.25 | length 4.7
  TopLayer w0.5: C202.2@25.773,29.776 25.773,30.643 26.063,30.933 FB24.2@26.063,30.983 26.063,31.033 26.467,31.437 27.778,31.437 v1(28.11,31.769)
  Bottom Layer w0.25: v1(28.11,31.769) 28.137,31.769 28.451,31.455 28.926,31.455 U9.25@28.931,31.45
VDDO_5: C213.2 C214.2 FB27.2 U9.28 | length 4.7
  TopLayer w0.3: FB27.2@26.273,33.721 C213.2@27.465,33.721 v1(28.05,33.721)
  TopLayer w0.5: C214.2@25.738,32.21 25.738,33.094 26.073,33.43 FB27.2@26.073,33.48 26.073,33.521 FB27.2@26.273,33.721
  Bottom Layer w0.25: v1(28.05,33.721) 28.079,33.693 28.079,33.632 28.761,32.95 U9.28@28.931,32.95
VDDO_6: C164.2 C165.2 FB18.2 U9.43 | length 4.6
  TopLayer w0.5: v1(37.513,33.986) 37.515,33.988 38.061,33.988 ; C165.2@38.061,34.881 38.061,33.988 ; FB18.2@39.215,33.777 FB18.2@39.345,33.647 39.345,33.697 39.145,33.897 39.095,33.897 39.004,33.988 38.061,33.988
  Bottom Layer w0.25: U9.43@36.731,32.95 37.076,32.95 37.513,33.386 v1(37.513,33.986)
VDDO_7/8: C193.2 C194.2 FB22.2 U9.46 | length 4.3
  TopLayer w0.25: v1(37.683,31.035) 37.751,31.035 37.837,30.949 C193.2@38.303,30.949 39.046,30.949 FB22.2@39.345,31.248
  TopLayer w0.5: FB22.2@39.345,31.248 39.345,31.298 39.663,31.617 C194.2@39.663,32.457
  Bottom Layer w0.25: U9.46@36.731,31.45 37.269,31.45 v1(37.683,31.035)
VDDO_9/10: C205.2 C206.2 FB25.2 U9.51 | length 5.5
  TopLayer w0.25: v1(38.32,28.625) 38.32,28.396 39.14,27.576 39.15,27.576 39.175,27.551 C205.2@39.175,27.541
  TopLayer w0.5: v1(38.32,28.625) 38.456,28.625 38.638,28.806 FB25.2@39.398,28.806 39.452,28.859 39.452,29.947 C206.2@39.477,29.972
  Bottom Layer w0.25: U9.51@36.731,28.95 37.995,28.95 v1(38.32,28.625)
pads on no net: U1. U1.32 U1.43 U1.44 U4.4 U4.7 U4.10 U4.15 U4.16 U4.26 U9. U9.1 U9.2 U9.3 U9.18 U9.19 U9.23 U9.24 U9.26 U9.27 U9.32 U9.33 U9.35 U9.36 U9.47 U9.48 U9.52 U9.53 U9.56 U11.6 U15.2 U15.6 U15.8 U15.9 U15.10 U19.6 U21.6 U23.6 U24.6 U32.5 U32.14 U32.15 U33.7 U33.10 U33.15 X1.2

## Polygon pours and split planes (outlines as drawn)
GND on Layer 1 "GND_L02_P217" (solid, remove dead copper, pour order 217): 0,59.975 0,6.033 2.064,3.97 21.882,3.97 23.725,2.127 23.725,0 30.146,0 30.146,3.856 30.542,4.252 31.777,4.252 32.175,3.854 32.175,0 47.854,0 47.854,2.941 48.236,3.324 69.365,3.324 69.676,3.635 69.676,59.975
RFGND on Layer 1 "RFGND_L02_P225" (solid, pour order 225): 0.225,83 68.55,83 69.676,81.874 69.676,61.228 68.723,60.275 0.9,60.275 0.15,61.025 0.15,82.925
PGND on TopLayer "PGND_L01_P232" (solid, remove dead copper, pour order 232): 13.893,12.003 15.261,12.003 15.36,12.102 15.36,12.714 14.972,13.102 12.001,13.102 11.727,12.828 11.727,12.694 11.439,12.406 10.228,12.406 9.881,12.753 8.587,12.753 8.587,10.521 9.606,10.521 9.606,12.028 9.654,12.076 11.366,12.076 11.722,11.721 11.722,11.259 11.847,11.134 13.352,11.128 13.502,11.277 13.576,11.277 13.576,11.9 13.679,12.003
NetL5_1 on TopLayer "NETL5_1_L01_P233" (solid, remove dead copper, pour order 233): 12.204,13.121 13.408,13.121 13.956,13.668 13.956,18.781 13.709,19.028 12.686,19.028 12.069,18.411 12.069,13.255
3V3@0A5_COM on TopLayer "3V3@0A5_COM_L01_P198" (solid, remove dead copper, pour order 198): 26.292,46.729 26.307,44.639 30.62,44.639 30.62,46.032 29.628,46.032 28.931,46.729
1V8@1A on TopLayer "1V8@1A_L01_P224" (solid, remove dead copper, pour order 224): 42.792,27.555 41.687,26.45 40.923,26.45 40.679,26.694 40.679,27.701 40.073,28.307 40.073,29.444 40.073,30.773 40.073,34.251 40.22,34.397 42.213,34.397 42.369,34.241 42.369,33.741 42.792,33.319
RFGND on TopLayer "RFGND_L01_P210" (solid, remove dead copper, pour order 210): 2.492,60.395 0,62.887 0,83.2 63.054,83.2 63.054,63.329 59.135,59.41 40.797,59.41 30.322,59.41 6.915,59.41 5.93,60.395
12V on TopLayer "12V_L01_P237" (solid, remove dead copper, pour order 237): 8.65,11.061 9.452,10.26 11.496,10.26 12.599,10.26 12.599,11.131 13.716,11.133 14.662,10.187 15.165,10.187 15.581,10.603 15.581,11.566 15.871,11.856 18.681,11.856 19.599,10.937 19.599,9.062 18.806,8.269 6.125,8.269 5.45,8.944 5.397,18.217 3.974,18.217 3.974,19.569 3.565,20.241 3.565,22.97 5.56,22.97 6.208,22.325 8.65,19.883
PGND on TopLayer "PGND_L01_P228" (solid, remove dead copper, pour order 228): 5.363,8.272 3.494,10.141 3.494,18.837 3.074,19.257 3.077,21.225 2.584,21.718 0.116,21.718 0,21.602 0,3.413 0.132,3.281 21.597,3.281 22.593,2.285 24.55,2.285 24.55,5.066 23.466,6.15 20.634,6.15 18.512,8.272
1V25@0A5 on TopLayer "1V25@0A5_L01_P242" (solid, remove dead copper, pour order 242): 18.031,33.905 20.824,33.905 20.824,31.37 20.657,31.203 18.4,31.203 18.031,31.572
3V6_DCDC on TopLayer "3V6_DCDC_L01_P240" (solid, remove dead copper, pour order 240): 11.097,27.132 11.004,27.039 11.004,26.603 10.804,26.403 9.471,26.403 9.397,26.338 9.397,23.152 9.476,23.082 10.804,23.082 10.804,22.383 10.886,22.301 12.375,22.301 13.575,22.301 13.825,22.551 13.825,26.104 12.798,27.132
3V6_DCDC on TopLayer "3V6_DCDC_L01_P239" (solid, remove dead copper, pour order 239): 11.85,43.475 11.871,43.454 14.604,43.454 14.604,39.83 13.425,38.651 13.425,37.469 13.311,37.355 13.311,36.941 12.658,36.288 11.411,36.288 9.647,38.052 9.647,42.826 10.296,43.475
6V_DCDC on TopLayer "6V_DCDC_L01_P234" (solid, remove dead copper, pour order 234): 7.688,23.869 7.688,24.834 7.946,25.092 7.946,26.338 8.119,26.512 8.181,26.512 8.181,31.018 7.708,31.492 6.428,31.492 5.85,30.913 5.85,23.869
1V8@1A on TopLayer "1V8@1A_L01_P238" (solid, remove dead copper, pour order 238): 18.832,29.506 19.324,29.014 25.207,29.014 25.207,27.003 23.803,27.003 21.872,25.072 16.643,25.072 16.643,26.834 17.319,27.51 17.319,29.506
3V6_DCDC on TopLayer "3V6_DCDC_L01_P235" (solid, remove dead copper, pour order 235): 14.291,12.003 16.231,12.003 16.231,13.942 17.558,15.269 17.558,18.217 16.149,19.625 14.869,19.625 14.291,19.047
PGND on TopLayer "PGND_L01_P205" (solid, remove dead copper, pour order 205): 1.974,24.449 2.178,24.245 2.933,24.245 3.221,24.533 3.221,24.667 5.696,24.667 5.771,24.592 5.771,24.012 5.601,23.842 5.173,23.842 5.07,23.738 5.07,23.116 4.995,23.116 4.846,22.967 3.34,22.973 3.215,23.097 3.215,23.559 2.933,23.842 1.533,23.842 1.41,23.719 1.41,23.116 1.41,22.098 0.081,22.098 0.081,24.449
NetL6_1 on TopLayer "NETL6_1_L01_P231" (solid, remove dead copper, pour order 231): 3.697,24.959 4.902,24.959 5.45,25.507 5.45,30.62 5.203,30.867 4.18,30.867 3.563,30.25 3.563,25.093
NetC41_2 on TopLayer "NETC41_2_L01_P221" (solid, remove dead copper, pour order 221): 22.463,42.911 22.738,42.636 23.309,42.636 23.309,41.556 17.386,41.556 17.11,41.832 17.11,42.973 17.253,42.973 18.151,43.871 18.151,46.032 18.902,46.032 19.112,45.822 19.112,44.166 19.272,44.007 21.139,44.007 21.593,43.553 21.593,42.911
3V3@1A_1 on TopLayer "3V3@1A_1_L01_P230" (solid, pour order 230): 38.061,21.959 29.784,21.959 29.784,20.273 30.131,19.927 38.061,19.927
NetC45_2 on TopLayer "NETC45_2_L01_P206" (solid, remove dead copper, pour order 206): 17.294,41.357 23.185,41.357 23.185,38.721 17.294,38.721
1V25@1A on Bottom Layer "1V25@1A_L06_P118" (solid, remove dead copper, pour order 118): 47.275,39.099 ccw(c47.275,38.803) 46.978,38.803 46.978,37.51 ccw(c47.166,37.51) 47.166,37.322 47.62,37.322 cw(c47.62,36.991) 47.951,36.991 ccw(c48.518,36.991) 48.518,36.425 49.058,36.425 ccw(c49.058,36.575) 49.208,36.575 49.208,36.775 cw(c49.558,36.775) 49.558,37.125 50.058,37.125 ccw(c50.058,37.275) 50.208,37.275 50.208,37.693 ccw(c49.708,37.693) 49.708,38.193 cw(c49.708,38.6) 49.302,38.6 49.302,38.939 ccw(c49.142,38.939) 49.142,39.099
2V5@1A on Bottom Layer "2V5@1A_L06_P117" (solid, pour order 117): 54.79,37.788 54.753,37.826 54.753,38.178 54.727,38.178 54.399,38.506 53.23,38.506 52.917,38.193 52.917,37.321 ccw(c53.092,37.321) 53.092,37.146 54.664,37.146 ccw(c54.664,37.272) 54.79,37.272
1V25@1A on Bottom Layer "1V25@1A_L06_P149" (solid, pour order 149): 47.178,27.224 ccw(c47.302,27.224) 47.302,27.1 48.483,27.1 cw(c48.483,26.851) 48.732,26.851 ccw(c49.149,26.851) 49.149,26.434 50.132,26.434 ccw(c50.132,26.608) 50.306,26.608 50.306,28.494 ccw(c49.725,28.494) 49.725,29.075 49.658,29.075 cw(c49.658,29.225) 49.508,29.225 ccw(c49.308,29.225) 49.308,29.425 48.546,29.425 ccw(c48.546,28.996) 48.117,28.996 cw(c47.868,28.996) 47.868,28.747 47.301,28.747 ccw(c47.301,28.624) 47.178,28.624
2V5@1A on Bottom Layer "2V5@1A_L06_P091" (solid, pour order 91): 52.678,27.432 52.678,26.646 52.785,26.539 54.619,26.539 54.719,26.639 54.719,27.779 54.208,28.29 54.208,28.888 54.125,28.972 52.981,28.972 52.908,28.899 52.908,28.775 52.908,27.663
12V on Bottom Layer "12V_L06_P226" (solid, remove dead copper, pour order 226): 4.92,10.79 4.92,8.907 18.979,8.907 18.979,11.056 18.735,11.3 5.43,11.3
+12 on Bottom Layer "+12_L06_P165" (solid, remove dead copper, pour order 165): 22.4,3.45 23.369,2.481 24.7,2.481 24.7,5.231 24.351,5.574 ccw(c23.658,4.745) 23.653,5.826 19.625,5.826 19.232,5.826 ccw(c19.232,5.573) 18.979,5.573 cw(c18.763,5.573) 18.763,5.357 8.038,5.357 ccw(c8.038,5.098) 7.779,5.098 7.779,4.035 ccw(c8.364,4.035) 8.364,3.45
2V5@1A on Bottom Layer "2V5@1A_L06_P128" (solid, remove dead copper, pour order 128): 47.646,37.184 cw(c47.646,36.878) 47.951,36.878 ccw(c48.405,36.878) 48.405,36.425 49.058,36.425 cw(c49.058,36.275) 49.208,36.275 49.208,35.925 cw(c48.908,35.925) 48.908,35.625 48.745,35.625 cw(c48.745,36.683) 47.997,35.935 47.925,36.007 ccw(c47.388,35.47) 47.388,36.229 cw(c47.388,36.567) 47.149,36.328 47.088,36.389 47.088,37.184
3V3@0A5 on Layer 2 "3V3@0A5_L03_P214" (solid, remove dead copper, pour order 214): 49.95,39.325 52.917,39.325 54.012,38.231 54.012,28.766 52.678,27.432 52.646,27.463 51.129,27.463 49.95,28.641 49.95,37.503
1V25@0A5 on Layer 2 "1V25@0A5_L03_P241" (solid, remove dead copper, pour order 241): 20.313,30.401 47.671,30.401 47.671,32.626 45.05,35.248 22.048,35.248 20.521,33.721 19.394,33.721 19.175,33.501 19.175,30.401
RFGND on Layer 2 "RFGND_L03_P227" (solid, pour order 227): 21.603,47.376 21.1,46.873 21.1,44.387 18.593,41.88 18.593,37.481 17.4,36.288 16.007,36.288 15.47,35.751 15.47,34.651 16.4,33.721 19.69,33.721 24.336,38.367 24.336,46.563 23.523,47.376
GND on Layer 4 "GND_L05_P243" (solid, remove dead copper, pour order 243): 31.153,4.306 31.475,4.306 cw(c31.475,3.612) 32.168,3.612 32.168,0 47.591,0 47.595,2.399 cw(c48.494,2.399) 48.494,3.298 67.31,3.298 ccw(c67.31,5.838) 69.85,5.838 69.85,21.851 69.85,37.399 69.85,49.225 67.909,51.166 58.048,41.304 58.011,39.651 58.011,37.722 ccw(c58.316,37.681) 58.008,37.681 cw(c57.153,37.68) 57.152,36.825 49.495,36.825 cw(c49.495,38.281) 48.039,38.281 48.039,40.374 ccw(c47.328,40.375) 47.328,41.085 45.445,41.085 43.705,42.826 43.705,58.284 25.469,58.284 24.9,57.715 24.9,40.228 24.52,39.849 8.072,39.849 7.294,39.07 4.404,39.07 4.404,6.729 23.199,6.729 23.855,6.728 cw(c23.856,5.684) 24.9,5.684 24.945,0 30.058,0 30.081,3.484 cw(c30.903,3.485) 30.903,4.306
RFGND on Layer 4 "RFGND_L05_P215" (solid, remove dead copper, pour order 215): 23.906,39.07 24.827,39.991 24.827,58.07 25.256,58.498 42.978,58.498 43.825,57.652 43.825,37.273 45.311,35.787 48.737,35.787 49.407,35.118 49.407,30.955 48.492,30.04 45.525,30.04 45.489,30.004 45.489,26.18 47.068,24.602 54.398,24.602 57.232,27.144 57.232,29.142 57.232,36.148 62.725,41.641 62.725,45.437 66.711,49.423 69.575,49.423 69.575,82.475 1.975,82.475 1.2,81.7 1.2,54.268 6.616,48.852 6.638,48.801 6.758,48.801 6.758,39.07
PGND on Layer 4 "PGND_L05_P161" (solid, remove dead copper, pour order 161): 4.25,33.05 4.25,25.017 4.465,24.802 6.396,24.802 6.396,23.391 5.554,22.55 4.407,22.55 3.47,21.612 3.47,10.188 3.893,9.764 10.571,9.764 11.454,10.648 11.454,13.169 11.629,13.343 15.001,13.343 15.657,12.686 15.657,8.104 17.089,6.673 23.103,6.673 23.114,6.684 24.269,6.684 24.777,6.176 24.777,3.432 21.044,3.432 0.017,3.432 0,3.449 0,32.75 0.303,33.053 3.74,33.053
1V25@1A on Layer 3 "1V25@1A_L04_P223" (solid, pour order 223): 46.135,41.815 49.011,38.939 49.011,26.851 45.873,26.851 44.042,28.683 44.042,41.815

## Keep-outs
KeepOutLayer:
  lines w0.1: 0,3.2 21.338,3.2 cw(c21.338,2.388) 22.15,2.388 22.15,0 22.5,0 30.4,0 30.4,3.246 cw(c31.148,3.246) 31.148,3.994 cw(c31.148,3.241) 31.9,3.241 31.9,3.2 31.9,0 47.85,0 47.85,2.399 cw(c48.651,2.399) 48.651,3.2 70,3.2 70,83.2 0,83.2 0,3.2

## Silkscreen, mask and mechanical layers (free items; w line width, h text height)
TopOverlay:
  lines w0.1: 42.007,33.429 41.955,28.904 41.473,28.256 41.473,24.676 43.775,24.676 43.775,28.25 43.775,33.2
  text "PERST2" at 10.169,58.437 h0.51
  text "Status0" at 43.521,24.037 h0.51 r270
  text "En_AD_SPI" at 61.488,18.118 h0.51 r270
  text "En_LMK_SPI" at 55.363,17.825 h0.51 r270
  text "AD_nCS" at 60.663,16.65 h0.51 r270
  text "AD_MOSI" at 57.491,16.188 h0.51 r270
  text "AD_CLK" at 56.688,16.128 h0.51 r270
  text "LMK_nCS" at 53.362,12.525 h0.51 r90
  text "LMK_CLK" at 47.92,12.4 h0.51 r90
  text "LMK_MOSI" at 48.862,12.4 h0.51 r90
  text "LMK_MISO" at 49.811,12.4 h0.51 r90
  text "SDA" at 32.33,12.104 h0.51 r90
  text "SCL" at 30.97,12.003 h0.51 r90
  text "PERST" at 29.744,11.644 h0.51 r180
  text "MISO" at 60.315,5.429 h0.51 r270
  text "xSDA" at 30.126,5.35 h0.51
  text "CLK" at 54.632,5.35 h0.51 r270
  text "nCS" at 61.085,5.31 h0.51 r270
  text "MOSI" at 55.466,5.24 h0.51 r270
  text "xSCL" at 30.126,4.471 h0.51
Bottom Overlay:
  lines w0.1: 10.475,71.475 10.475,61.375 12.75,61.375 ; 10.475,78.925 10.475,81.05 11.85,81.05 ; 19.675,81.05 49.575,81.125 ; 20.25,61.375 28.725,61.375 ; 36.427,61.375 46.204,61.375 ; 53.775,61.375 62.125,61.375 62.125,62.55 ; 57.29,81.125 62.05,81.125 62.05,79.225 ; 62.05,70.175 62.05,71.583
PCI-SIG Outline:
  lines w0.1: 21.35,3.2 cw(c21.35,2.4) 22.15,2.4